# Altium PCB BLDC-Driver-v2.0.PcbDoc (part 6 of 6)
Units mil, origin at the board's own origin, x right, y up, seen from the top; angles counter-clockwise.
Board outline 5905.51 x 4330.71 mil, 4 copper layers (Top Layer, Layer 1, Layer 2, Bottom Layer), stack 62.047 mil thick; 284 components, 198 nets, 819 pads, 521 vias.
Unrouted connection lines stored in the file: 1.
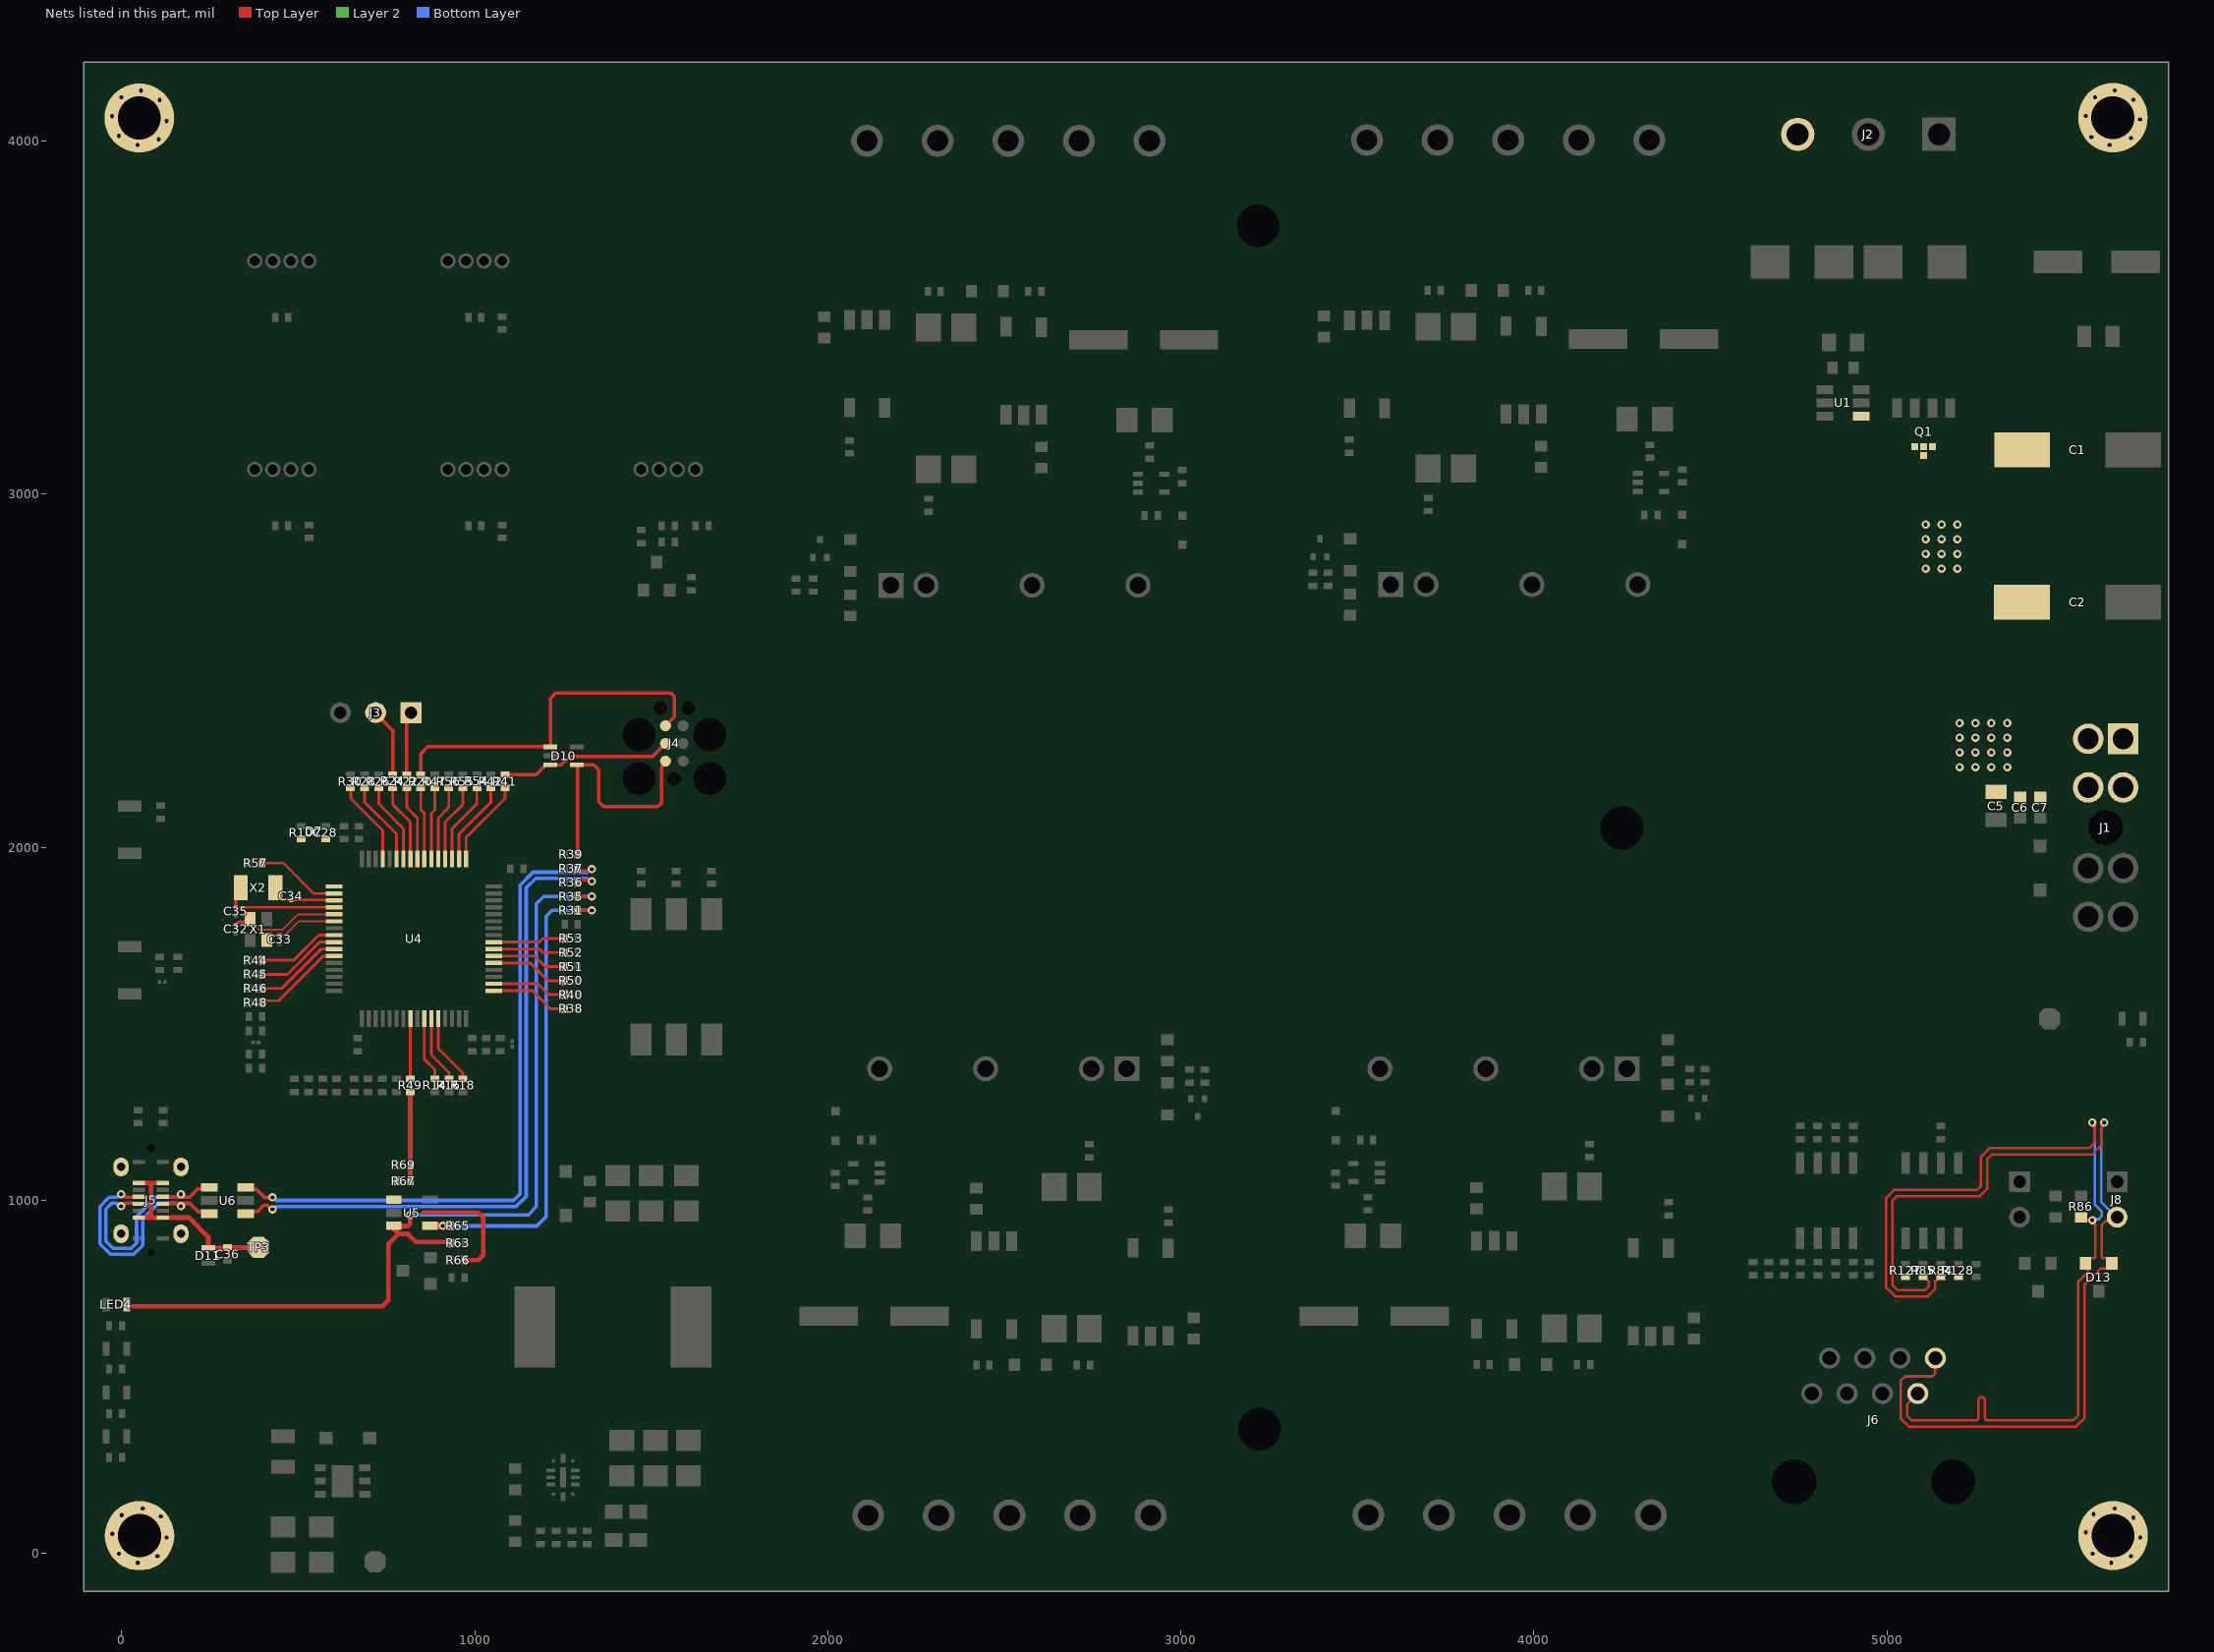
[diagram p5: the nets of this part, all layers, seen from the top]

## Via types
v1: diameter 23.62, hole 11.81, Top Layer to Bottom Layer, tented both sides, 497 vias
v2: diameter 15.75, hole 7.87, Top Layer to Bottom Layer, 24 vias

## Nets (pads, with @x,y where several pads share a name; then routed paths per layer and width w, separated by ;. In a path a pad name is that pad's centre, name@x,y a point inside that pad or via, vN(x,y) a via of type N, cw(c..) or ccw(c..) an arc to the next point about the centre after c; other vN are vias at no path point) (continued)
PA14: R41.1 U4.49 | length 246.4
  Top Layer w8: U4.49@975.51,1967.47 975.51,2027.66 1085.75,2137.89 R41.1@1085.75,2168.24
PA15: R42.1 U4.50 | length 238.1
  Top Layer w8: U4.50@955.83,1967.47 955.83,2037.4 1045.98,2127.55 R42.1@1045.98,2168.24
PB0: R14.2 U4.26 | length 183.2
  Top Layer w8: U4.26@857.4,1514.71 857.4,1399.51 887.32,1369.59 R14.2@887.32,1343.94
PB1: R16.2 U4.27 | length 191.5
  Top Layer w8: U4.27@877.09,1514.71 877.09,1411.32 927.09,1361.32 R16.2@927.08,1343.94
PB2: R18.2 U4.28 | length 199.8
  Top Layer w8: U4.28@896.77,1514.71 896.77,1429.82 966.85,1359.75 R18.2@966.85,1343.94
PB3: R20.2 U4.55 | length 204.8
  Top Layer w8: R20.2@847.56,2168.24 847.56,2106.3 857.4,2096.46 U4.55@857.4,1967.47
PB4: R22.2 U4.56 | length 213.2
  Top Layer w8: R22.2@807.8,2168.24 807.8,2112.59 837.72,2082.68 U4.56@837.72,1967.47
PB5: R24.2 U4.57 | length 221.5
  Top Layer w8: R24.2@768.04,2168.24 768.04,2120.86 818.03,2070.87 U4.57@818.03,1967.47
PB6: R26.2 U4.58 | length 229.8
  Top Layer w8: R26.2@728.27,2168.24 728.27,2122.44 798.35,2052.36 U4.58@798.35,1967.47
PB7: R28.2 U4.59 | length 238.1
  Top Layer w8: R28.2@688.51,2168.24 688.51,2127.55 778.66,2037.4 U4.59@778.66,1967.47
PB8: R30.2 U4.61 | length 238.3
  Top Layer w8: R30.2@648.75,2168.24 648.75,2137.89 739.29,2047.34 U4.61@739.29,1967.47
PB12: R38.2 U4.33 | length 221.8
  Top Layer w8: U4.33@1054.25,1593.45 1163.55,1593.45 1183.24,1573.77 1214.33,1542.67 R38.2@1255.03,1542.67
PB13: R40.2 U4.34 | length 213.5
  Top Layer w8: U4.34@1054.25,1613.14 1178.52,1613.14 1209.22,1582.43 R40.2@1255.03,1582.44
PC0: R44.1 U4.8 | length 233
  Top Layer w8: R44.1@398.01,1679.62 487.04,1679.62 558.35,1750.94 U4.8@601.5,1750.94
PC1: R45.1 U4.9 | length 241.3
  Top Layer w8: R45.1@398.01,1639.86 469.61,1639.86 561.01,1731.25 U4.9@601.5,1731.25
PC2: R46.1 U4.10 | length 249.7
  Top Layer w8: R46.1@398.01,1600.09 453.51,1600.09 564.98,1711.57 U4.10@601.5,1711.57
PC3: R48.1 U4.11 | length 258
  Top Layer w8: R48.1@398.01,1560.33 402.86,1565.18 444.31,1565.18 571.01,1691.87 U4.11@601.5,1691.88
PC4: R49.1 U4.24 | length 170.8
  Top Layer w8: R49.1@818.03,1343.95 U4.24@818.03,1514.71
PC6: R50.1 U4.37 | length 221.5
  Top Layer w8: U4.37@1054.25,1672.2 1157.65,1672.2 1207.65,1622.2 R50.1@1255.03,1622.2
PC7: R51.1 U4.38 | length 213.2
  Top Layer w8: U4.38@1054.25,1691.88 1169.46,1691.88 1199.38,1661.96 R51.1@1255.03,1661.96
PC8: R52.1 U4.39 | length 204.8
  Top Layer w8: U4.39@1054.25,1711.57 1183.24,1711.57 1193.08,1701.73 R52.1@1255.03,1701.73
PC9: R53.1 U4.40 | length 204.8
  Top Layer w8: U4.40@1054.25,1731.25 1183.24,1731.25 1193.08,1741.09 R53.1@1255.03,1741.09
PC10: R54.1 U4.51 | length 229.8
  Top Layer w8: U4.51@936.14,1967.47 936.14,2052.36 1006.22,2122.44 R54.1@1006.22,2168.25
PC11: R55.1 U4.52 | length 221.5
  Top Layer w8: U4.52@916.46,1967.47 916.46,2070.87 966.46,2120.86 R55.1@966.46,2168.24
PC12: R56.1 U4.53 | length 213.2
  Top Layer w8: U4.53@896.77,1967.47 896.77,2082.68 926.69,2112.59 R56.1@926.69,2168.24
PC13: R57.1 U4.2 | length 239.2
  Top Layer w7: R57.1@398.01,1955.23 457.77,1955.23 543.95,1869.05 U4.2@601.5,1869.05
PC14-OSC32_IN: C34.2 U4.3 X2.2 | length 147.2
  Top Layer w7: X2.2@452.39,1850.3 C34.2@479.87,1850.3 ; C34.2@481.03,1850.14 U4.3@600.72,1850.14
PC15-OSC32_OUT: C35.2 U4.4 X2.1 | length 338.3
  Top Layer w7: C35.2@323.51,1829.8 323.51,1871.27 X2.1@337.28,1885.05 ; C35.2@324.12,1829.68 U4.4@601.5,1829.68
PD2: R47.2 U4.54 | length 204.8
  Top Layer w8: U4.54@877.09,1967.47 877.09,2096.46 886.93,2106.3 R47.2@886.93,2168.24
PH0-OSC_IN: C32.2 U4.5 X1.1 | length 313.4
  Top Layer w5.5: X1.1@363.76,1792.48 389.35,1766.9 456.86,1766.9 499.95,1809.99 U4.5@601.5,1809.99
  Top Layer w10: C32.2@323.51,1779.71 332.06,1788.26 355.6,1788.26 X1.1@363.76,1796.42
PH1-OSC_OUT: C33.2 U4.6 X1.3 | length 212.6
  Top Layer w5.5: X1.3@411.01,1737.37 411.01,1737.74 423.76,1750.49 C33.2@448.39,1750.49 449.06,1751.17 462.55,1751.17 467.78,1756.4 468.05,1756.4 501.96,1790.31 U4.6@601.5,1790.31
RS485_N: D13.2 J6.2 R84.2 R86.2 R128.1 | length 2843.6
  Top Layer w7: J6.2@5087.62,452.67 5057.29,422.34 5057.29,389.56 5069.85,377 5235.9,377 5251.6,377 ccw(c5251.6,385.5) 5260.1,385.5 5260.1,433.87 cw(c5268.6,433.87) 5277.1,433.87 5277.1,385.5 ccw(c5285.6,385.5) 5285.6,377 5306.1,377 5528.65,377 5542.21,390.56 5542.21,769.47 5569.26,796.52 5569.26,811.49 D13.2@5565.93,814.82 ; R84.2@5152.96,782.78 5149.46,782.78 5143.96,777.28 5143.96,777.1 5136.96,770.1 5136.96,748.92 5115.7,727.66 5023.45,727.66 4998.39,752.71 4998.39,1006.75 5021.17,1029.53 5256,1029.53 5266.5,1040.03 5266.5,1123.76 5290.39,1147.64 5573.41,1147.64 5589.76,1163.99 5589.76,1207.69 5581.95,1215.5 v1(5581.95,1220) ; R86.2@5547.62,952.18 5556.04,943.75 v1(5581.8,943.75) ; D13.2@5562.56,823 5575.2,835.64 5586.86,835.64 5590.96,839.74 5590.96,931.34 5582.21,940.09 v1@5582.21,944.16
  Layer 2 w7: J6.2@5087.62,452.67 J6.2@5099.14,452.67
  Bottom Layer w7: v1(5581.8,943.75) 5584.72,946.67 5600.56,946.67 5608.48,954.59 5608.48,968.58 5589.01,988.04 5589.01,1208.44 5581.95,1215.5 v1(5581.95,1220)
RS485_P: D13.1 J6.1 J8.2 R85.2 R127.1 | length 2905.7
  Top Layer w7: R85.2@5102.96,782.78 5106.46,782.78 5111.96,777.28 5111.96,777.18 5118.96,770.18 5118.96,756.37 5108.24,745.66 5030.9,745.66 5016.39,760.17 5016.39,999.3 5028.62,1011.53 5263.46,1011.53 5284.5,1032.58 5284.5,1116.3 5297.84,1129.64 5580.86,1129.64 5607.76,1156.53 5607.76,1207.69 5615.57,1215.5 v1(5615.57,1220) ; J6.1@5137.62,552.67 5137.62,510.07 5128.85,501.3 5052.1,501.3 5039.29,488.48 5039.29,382.1 5062.39,359 5536.1,359 5560.21,383.11 5560.21,762.01 5604.62,806.42 5624.72,806.42 D13.1@5637.36,819.06 ; D13.1@5637.36,823 5624.72,835.64 5613.06,835.64 5608.96,839.74 5608.96,930.74 5620.44,942.22 5642.33,942.22 J8.2@5652.3,952.18
  Bottom Layer w7: v1(5615.57,1220) 5615.57,1216.15 5607.01,1207.59 5607.01,995.5 5650.34,952.18 J8.2@5652.3,952.18
SHGND: J2.3 J5.S1 J5.S2 J5.S3 J5.S4 pad.MH1@49.93,4065.68 pad.MH1@50.67,49.93 pad.MH1@5640.49,4066.42 pad.MH1@5640.85,50.3
  other v1: 45.51,-27.07 5635.85,-26.86 101.42,-8.05 5691.77,-7.84 -7.48,-0.98 5582.87,-0.77 127.51,44.93 5717.85,45.14 -26.49,54.93 5563.88,59.54 5698.84,101.05 111.49,104.85 -0.4,107.92 5585.94,111.12 59.91,126.91 5645.85,127.14 44.93,3988.85 5631.25,3989.45 104.85,4004.86 5691.56,4008.44 5579.67,4011.51 -8.05,4014.93 126.91,4056.44 5717.65,4061.42 -27.07,4070.85 5563.65,4071.42 107.92,4116.76 5698.63,4117.33 -0.98,4123.83 5589.74,4124.4 54.93,4142.85 5645.65,4143.42
SWCLK: D10.3 J4.4 R41.2 | length 491.6
  Top Layer w10: R41.2@1085.75,2205.24 1085.83,2205.33 1173.72,2205.33 1201.8,2233.41 D10.3@1214.6,2233.41 1245.86,2233.41 1269.74,2257.29 1503.81,2257.29 J4.4@1540.56,2294.05
SWDIO: D10.4 J4.2 R39.2 | length 724.4
  Top Layer w10: R39.2@1292.03,1980.07 1292.03,2231.52 1290.14,2233.41 D10.4@1289.4,2233.41 1337.82,2233.41 1351.55,2219.69 1351.55,2128.58 1365.13,2115 1518.29,2115 1529.99,2126.69 1529.99,2227.79 1540.56,2238.37 J4.2@1540.56,2244.05
SWO: D10.1 J4.6 R20.1 | length 1026.2
  Top Layer w10: R20.1@847.16,2205.24 847.16,2264.76 866.99,2284.59 1145.98,2284.59 D10.1@1214.6,2284.59 1214.6,2421.26 1230.44,2437.1 1554.42,2437.1 1565.56,2425.95 1565.56,2369.05 J4.6@1540.56,2344.05
USART2_RX: J3.2 R24.1 | length 197.3
  Top Layer w10: J3.2@719.43,2381.09 718.53,2380.2 768.53,2330.2 768.53,2206.14 R24.1@767.63,2205.25
USART2_TX: J3.1 R22.1 | length 175.8
  Top Layer w10: R22.1@807.4,2205.24 J3.1@807.4,2381.09
USB_FS_N: R36.2 U6.1 | length 1946.1
  Top Layer w10: U6.1@351.57,961.85 357.9,968.17 385.12,968.17 403,986.05 412.24,986.05 423.95,974.34 v1(427,974.34) ; R36.2@1292.03,1900.54 1292.03,1903.61 1296.03,1907.61 1324.32,1907.61 1328.31,1903.61 v1(1332,1903.61)
  Bottom Layer w10: v1(427,974.34) 430.69,974.34 439,982.65 1117.88,982.65 1146,1010.78 1146,1885.47 1172.74,1912.21 1319.72,1912.21 1328.31,1903.61 v1(1332,1903.61)
USB_FS_OVCR: LED4.2 R35.2 R63.1 U5.3 | length 2668.5
  Top Layer w10: R35.2@1292.03,1860.78 v1(1332,1860.78)
  Top Layer w13.21: LED4.2@14.81,704.56 14.81,702.91 18.04,699.68 738.42,699.68 755.91,717.16 755.91,877.08 783.58,904.75 786.25,904.75 ; U5.3@770.82,927.22 U5.3@772.09,927.22 ; 794.56,904.75 786.25,904.75 ; 796.39,904.75 811.97,904.75 811.97,903.17 833.34,881.79 932.11,881.79 934.5,879.4 R63.1@934.5,878.62 ; v1(816.82,958.84) 816.82,932.43 811.61,927.22 U5.3@772.09,927.22 ; U5.3@772.09,927.22 771.61,927.7 759.69,927.7 766.3,921.99 786.25,904.75
  Bottom Layer w10: v1(816.82,958.84) 1152.1,958.84 1175,981.74 1175,1840.02 1195.76,1860.78 v1(1332,1860.78) v1@1335,1860.78
USB_FS_P: R37.2 U6.3 | length 1943.3
  Top Layer w10: U6.3@351.57,1036.65 357.79,1030.43 382.79,1030.43 405.26,1007.96 v1(427,1007.96) ; R37.2@1292.03,1940.31 1292.03,1937.28 1296.03,1933.28 1323.78,1933.28 1328.31,1937.81 v1(1332,1937.81)
  Bottom Layer w10: v1(427,1007.96) 430.69,1007.96 439,999.65 1110.84,999.65 1129,1017.82 1129,1892.51 1165.7,1929.21 1319.72,1929.21 1328.31,1937.81 v1(1332,1937.81)
USB_FS_PWR_EN: R31.2 R65.1 U5.4 | length 1393
  Top Layer w10: R31.2@1292.03,1821.02 v1(1332,1821.02)
  Top Layer w20: U5.4@873.18,927.22 v1(909.46,927.22) R65.1@932.08,927.22
  Bottom Layer w10: v1(909.46,927.22) 1175.72,927.22 1202.84,954.34 1202.84,1805.12 1218.73,1821.02 v1(1332,1821.02) v1@1335,1821.02
USB_N: J5.A7 J5.B7 U6.6 | length 749
  Top Layer w10: v1(-1.57,1016.65) 2.11,1016.65 10.42,1008.34 34.64,1008.34 35.08,1008.78 47.89,1008.78 J5.A7@48.9,1009.8 ; J5.B7@117.13,990 118.03,990.91 131.06,990.91 131.27,991.11 179.48,991.11 ; 155.95,991.11 v1@164.03,983.03 ; v1(167.72,983.03) 171.4,983.03 179.48,991.11 ; U6.6@244.28,962.44 239.23,967.49 216.63,967.49 193.01,991.11 179.48,991.11
  Bottom Layer w10: v1(-1.57,1016.65) -5.26,1016.65 -13.57,1008.34 -35.43,1008.34 -61.31,982.46 -61.31,876.76 -31.33,846.78 34.12,846.78 59.41,872.08 59.41,947.27 103.49,991.34 155.72,991.34 164.03,983.03 v1(167.72,983.03)
USB_P: J5.A6 J5.B6 U6.4 | length 688.9
  Top Layer w10: v1(-1.57,983.03) 2.11,983.03 10.42,991.34 34.64,991.34 35.08,990.91 48.11,990.91 J5.A6@49.02,990 ; J5.B6@117.46,1009.35 118.03,1008.78 131.06,1008.78 131.73,1008.11 191.89,1008.11 215.71,1031.93 238.96,1031.93 U6.4@244.28,1037.24 ; 155.95,1008.57 v1@164.03,1016.65 ; v1@171.4,1016.65 179.48,1008.57
  Bottom Layer w10: v1(-1.57,983.03) -5.26,983.03 -13.57,991.34 -28.39,991.34 -44.31,975.42 -44.31,883.8 -24.29,863.78 27.07,863.78 42.41,879.12 42.41,954.31 96.45,1008.34 155.72,1008.34 164.03,1016.65 v1(167.72,1016.65)
VBAT: C28.2 D7.2 R10.2 U4.1
VBUS_DET: R49.2 R67.1 R69.2 | length 252.1
  Top Layer w13.21: R67.1@817.75,1054.81 R49.2@817.79,1306.95
VBUSc: C36.1 D11.1 J5.A4 J5.A9 J5.B4 J5.B9 R66.1 R67.2 TP3.1 U5.1 | length 899.5
  Top Layer w13.21: J5.A4@49.02,950.63 83.07,950.63 ; J5.A9@49.02,1049.06 83.07,1049.06 ; J5.B4@117.13,1049.06 83.07,1049.06 ; C36.1@299.66,865.16 D11.1@245.5,865.16 245.5,896.43 191.3,950.63 J5.B9@117.13,950.63 83.07,950.63 ; C36.1@300.5,866 387.23,866 TP3.1@388.07,866.84 ; 854.71,965.8 1009.41,965.8 1024,951.21 1024,843.86 1010.73,830.59 R66.1@971.51,830.59 ; 83.07,950.63 83.07,1049.06
VIN: C1.1 C2.1 C5.2 C6.2 C7.2 J1.1 J1.2 J1.7 J1.8 Q1.5 Q1.6 Q1.7 Q1.8 U1.4
  other v1: 5206,2227 5251,2227 5296,2227 5341,2227 5206,2268.64 5251,2268.64 5296,2268.64 5341,2268.64 5206,2310.28 5251,2310.28 5296,2310.28 5341,2310.28 5206,2351.92 5251,2351.92 5296,2351.92 5341,2351.92 5110,2789.33 5155,2789.33 5200,2789.33 5110,2830.98 5155,2830.98 5200,2830.98 5110,2872.62 5155,2872.62 5200,2872.62 5110,2914.26 5155,2914.26 5200,2914.26
pads on no net: D10.5 J1. J4.MP1 J4.MP2 J4.MP3 J4.MP4 J4.MP5 J4.MP6 J4.MP7 J5.A8 J5.B8 J5.MH J6. J6.3 J6.6 LED10.1 U3.1 U3.4 U3.5 U4.25 U4.29 U4.35 U4.36 U6.5

## Polygon pours and split planes (outlines as drawn)
GND on Layer 1 "GND_L02_P175" (solid, pour order 175): -107.18,-107.18 -107.18,4223.53 5798.33,4223.53 5798.33,-107.18
SHGND on Layer 1 "SHGND_L02_P111" (solid, pour order 111): 110.19,925.59 165.78,870 200.19,870 209,878.81 209,1120.63 201.46,1128.17 162.57,1128.17 108.5,1074.11 55.89,1074.11 0,1130 0,3869.25 256.35,3869.25 256.35,4125.95 2844.77,4125.95 4663.01,4125.95 4680,4108.96 4680,3960 4690,3950 4800,3950 4810,3960 4810,4110 4835,4135 5444.05,4135 5444.05,3860 5715,3860 5715,-96.98 5798.33,-96.98 5798.33,3920 5798.33,4223.53 -107.18,4223.53 -107.18,-107.18 0,-107.18 0,870 55.59,925.59
AGND on Layer 1 "AGND_L02_P130" (solid, pour order 130): 253,1521.97 263.68,1532.65 562.65,1532.65 578.02,1548.02 578.02,1772.78 595.55,1791.33 662.27,1791.33 677.24,1776.36 677.24,1461.88 661.99,1446.63 265.15,1446.63 253,1458.78
SHGND on Layer 1 "SHGND_L02_P110" (solid, pour order 110): 247.47,-35 247.47,256.72 -16.81,256.72 -106.81,346.72 -106.81,-106.81 5798.7,-106.81 5798.7,310 5735.8,247.1 5434.8,247.1 5434.8,-35
3V3 on Layer 2 "3V3_L03_P124" (solid, remove dead copper, pour order 124): 1003.56,2807 1911.15,2807 1964.46,2860.3 4449.93,2860.3 4449.93,3072.44 2577.45,3072.44 2577.45,3381.03 4655.28,3381.03 4655.28,1314.97 5225.44,1314.97 5225.44,699.5 2640.98,699.5 2640.98,1119.52 2481.29,1119.52 2481.29,699.5 1920.5,699.5 1897,723 1897,910 1853,954 1246.43,954 1142.43,850 909.13,850 870.06,810.92 870.06,239.06 823,192 351,192 292,251 292,1059.25 2348.94,1059.25 2348.94,1254.56 2561.13,1254.56 2609.69,1206 2679.23,1206 2553.73,1331.5 482.91,1331.5 450.69,1363.73 450.69,2125.16 484.78,2159.25 1003.56,2159.25 1141.65,2021.16 3997.75,2021.16 4328.26,1690.65 4328.26,1193.7 4408.44,1193.7 4408.44,1740.18 4026.41,2122.21 1271,2122.21 1189.79,2122.21 1037,2275 1037,2585.09 3508,2585.09 3508,2644 1003.56,2644
24V on Layer 2 "24V_L03_P171" (solid, pour order 171): 5772.71,1350 5772.71,2022 4694.33,2022 4694.33,1350
5V on Layer 2 "5V_L03_P125" (solid, remove dead copper, pour order 125): 835.2,158 903.68,226.48 903.68,803.68 922.95,822.95 1162.51,822.95 1261.56,922 1840.16,922 1865.67,896.49 1865.67,701.61 1900.28,667 2499.12,667 2609.47,556.65 5218.96,556.65 5218.96,-79.35 -84.95,-79.35 -84.95,4195.42 4655.28,4195.42 4655.28,3425.29 2521,3425.29 2521,3041 294,3041 255.49,3002.49 255.49,1978.99 255.49,1144.1 255.49,239.51 337,158
VIN on Layer 2 "VIN_L03_P178" (solid, pour order 178): 4694.33,3174.78 4694.33,2067 5772.71,2067 5772.71,3174.78
NetC3_1 on Layer 2 "NETC3_1_L03_P177" (solid, pour order 177): 4694.33,3217.94 4694.33,4195.42 5772.71,4195.42 5772.71,3217.94
24V on Layer 2 "24V_L03_P123" (solid, pour order 123): 1095.48,213.91 1080.9,228.49 1080.9,390.15 1094.9,404.15 1576.59,404.15 1591.99,388.76 1591.99,224.34 1581.56,213.91
GND on Top Layer "GND_L01_P179" (solid, remove dead copper, pour order 179): 4544,335.66 5798.7,335.66 5798.7,-83.86 -77,-83.86 -77,4194.56 5779.62,4194.56 5779.62,1284.41 4544,1284.41
24V on Top Layer "24V_L01_P169" (solid, remove dead copper, pour order 169): 4692.8,2608 4731.41,2646.61 4731.41,3165 4870,3165 4870,2099 5779.62,2099 5779.62,1284.41 4507.32,1284.41 4507.32,1331.88 4184.62,1331.88 4184.62,1284.41 3127.16,1284.41 3127.16,1331.88 2767.62,1331.88 2767.62,1284.41 2253,1284.41 2253,2576.71 2046.29,2576.71 2046.29,2780.9 2044.24,2796.65 2258.46,2796.65 2258.46,2826.61 3315.47,2826.61 3315.47,2783.05 3674.44,2783.05 3674.44,2826.61 4188.67,2826.61 4188.67,2608
GND on Top Layer "GND_L01_P168" (solid, pour order 168): 3715.23,2846.89 3715.23,2900.7 3315.06,2900.7 3315.06,3644.56 4036.2,3644.56 4036.2,3150.1 4324.82,3150.1 4324.82,3315.56 4456.46,3315.56 4471.33,3300.69 4471.33,2846.89
MOT3_PWR_POS on Top Layer "MOT3_PWR_POS_L01_P167" (solid, pour order 167): 4492.21,3226.42 4492.21,3310.9 4466.55,3336.56 4324.82,3336.56 4324.82,3603.02 4262.06,3665.78 4262.06,4194.56 4711.06,4194.56 4711.06,2665.56 4674.55,2629.05 4209.06,2629.05 4209.06,2826.5 4463.67,2826.5 4492.21,2855.04
MOT3_PWR_NEG on Top Layer "MOT3_PWR_NEG_L01_P166" (solid, pour order 166): 4303.46,3592.15 4241.45,3654.16 4241.45,4194.56 4056.21,4194.56 4056.21,3801.31 4056.21,3170.31 4303.46,3170.31
GND on Top Layer "GND_L01_P165" (solid, pour order 165): 2299.24,2844.75 2299.24,2898.56 1909,2898.56 1909,3642.41 2620.22,3642.41 2620.22,3147.95 2908.84,3147.95 2908.84,3313.41 3040.48,3313.41 3055.35,3298.55 3055.35,2844.75
MOT4_PWR_POS on Top Layer "MOT4_PWR_POS_L01_P164" (solid, pour order 164): 3076.23,3224.28 3076.23,3308.75 3050.57,3334.41 2908.84,3334.41 2908.84,3600.88 2846.08,3663.63 2846.08,4192.41 3295.08,4192.41 3295.08,2663.41 3258.57,2626.9 2793.08,2626.9 2793.08,2824.36 3047.69,2824.36 3076.23,2852.9
MOT4_PWR_NEG on Top Layer "MOT4_PWR_NEG_L01_P163" (solid, pour order 163): 2887.48,3590.01 2825.47,3652.02 2825.47,4192.41 2640.23,4192.41 2640.23,3799.17 2640.23,3168.17 2887.48,3168.17
5V on Top Layer "5V_L01_P126" (solid, remove dead copper, pour order 126): 1230.78,850 1330,850 1340,840 1339.67,839.67 1339.67,526.33 1670.62,526.33 1670.62,995.38 1656.19,1009.81 1247.2,1009.81 1230.78,993.38
GND on Top Layer "GND_L01_P156" (solid, pour order 156): 4143.83,1264.67 4143.83,1210.86 4544,1210.86 4544,467 3822.86,467 3822.86,961.46 3534.24,961.46 3534.24,796 3402.6,796 3387.73,810.86 3387.73,1264.67
GND on Top Layer "GND_L01_P155" (solid, pour order 155): 2726.99,1263.81 2726.99,1210 3127.16,1210 3127.16,466.14 2406.01,466.14 2406.02,960.6 2117.4,960.6 2117.4,795.14 1985.75,795.14 1970.89,810.01 1970.89,1263.81
MOT1_PWR_POS on Top Layer "MOT1_PWR_POS_L01_P154" (solid, pour order 154): 1950.01,884.28 1950.01,799.8 1975.67,774.14 2117.4,774.14 2117.4,507.68 2180.16,444.92 2180.16,-83.86 1731.16,-83.86 1731.16,1445.14 1767.67,1481.65 2233.16,1481.65 2233.16,1284.2 1978.54,1284.2 1950.01,1255.66
MOT1_PWR_NEG on Top Layer "MOT1_PWR_NEG_L01_P151" (solid, pour order 151): 2138.75,518.55 2200.76,456.54 2200.76,-83.86 2386.01,-83.86 2386.01,309.39 2386.01,940.39 2138.75,940.39
MOT2_PWR_POS on Top Layer "MOT2_PWR_POS_L01_P150" (solid, pour order 150): 3366.85,885.14 3366.85,800.66 3392.51,775 3534.24,775 3534.24,508.54 3597,445.78 3597,-83 3148,-83 3148,1446 3184.51,1482.51 3650,1482.51 3650,1285.05 3395.39,1285.05 3366.85,1256.51
MOT2_PWR_NEG on Top Layer "MOT2_PWR_NEG_L01_P142" (solid, pour order 142): 3555.59,519.41 3617.61,457.39 3617.61,-83 3802.85,-83 3802.85,310.25 3802.85,941.25 3555.59,941.25
24V on Top Layer "24V_L01_P141" (solid, pour order 141): 5779.62,1986.79 5779.62,1329.62 5750,1300 5411.06,1300 5378.26,1332.8 5378.26,1986.79
NetC3_1 on Top Layer "NETC3_1_L01_P140" (solid, pour order 140): 5064.19,3292 4970,3292 4970,3574 5084.13,3574 5084.13,4195.42 5779.62,4195.42 5779.62,3194.77 5064.19,3194.77
VIN on Top Layer "VIN_L01_P139" (solid, pour order 139): 4995.45,3174.78 4995.45,3233.26 4890.88,3233.26 4890.88,2119.54 5779.62,2119.54 5779.62,3174.78
VBUSc on Top Layer "VBUSC_L01_P138" (solid, pour order 138): 715,720 728.69,733.69 728.69,938.87 739.96,950.14 988.36,950.14 995.68,942.82 995.68,878.49 969.87,878.49 953,861.62 953,812.93 1056.93,812.93 1056.93,970 1044.82,984.18 881.18,984.18 833.09,1032.28 788.71,1032.28 788.71,1067.28 659.46,1067.28 647,1054.81 647.29,991.19 612.63,956.54 -54.09,956.54 -54.09,720
3V3 on Top Layer "3V3_L01_P137" (solid, pour order 137): 883,288.1 900,305.1 900,656.81 883.81,673 3,673 -7.54,662.46 -7.54,611.58 53.42,611.58 60.82,604.18 60.82,552.82 53.71,545.71 -7.54,545.71 -7.54,487.76 53.24,487.76 60.82,480.18 60.82,429.82 52.89,421.89 -7.54,421.89 -7.54,363.65 53.76,363.65 61.87,355.54 61.87,288.1 656.23,288.1 656.23,364.65 750,364.65 750,288.1
24V on Top Layer "24V_L01_P136" (solid, pour order 136): 1324.43,384.1 1340.33,400 1628,400 1670.57,400 1670.57,289.14 1365,289.14 1365,229.24 1272.07,229.24 1272.07,241.86 1324.43,241.86
GND on Top Layer "GND_L01_P135" (solid, pour order 135): 1189.6,127.24 1189.6,151.57 1163.61,151.57 1163.61,86.06 1260.86,86.06 1260.86,243.34 1239.9,243.34 1239.9,127.24
24V on Top Layer "24V_L01_P133" (solid, pour order 133): 1228.76,241.86 1176.4,241.86 1176.4,296.83 1149.72,296.83 1149.72,228.24 1228.76,228.24
NetC9_1 on Top Layer "NETC9_1_L01_P132" (solid, pour order 132): 1080,755.46 1260.87,755.46 1260.87,256.13 1240.01,256.13 1240.01,319.99 1239.61,320.39 1132.36,320.39 1132.36,220.87 1132.36,208.62 1080,208.62
AGND on Top Layer "AGND_L01_P131" (solid, remove dead copper, pour order 131): 638.83,1680.91 635.16,1677.23 601.5,1677.23 601.5,1667.26 669.97,1667.26 677.24,1674.53 677.24,1767.71 674.33,1770.62 641.65,1770.62 638.83,1767.81
AVDD on Top Layer "AVDD_L01_P129" (solid, pour order 129): 385.06,1532.65 432.34,1532.65 565.98,1666.29 625.12,1666.29 625.12,1600.06 426.83,1401.77 385.06,1401.77
AGND on Top Layer "AGND_L01_P128" (solid, pour order 128): 369.92,1386.59 322.93,1386.59 322.93,1441.97 373.78,1441.97 373.78,1532.65 263.68,1532.65 253,1521.97 253,1376.38 267.79,1361.59 369.92,1361.59
VBAT on Top Layer "VBAT_L01_P127" (solid, pour order 127): 625.12,1923.46 606.27,1923.46 596.26,1933.47 596.26,2037.92 496.41,2037.92 496.41,1938.39 549.53,1885.27 625.12,1885.27
GND on Bottom Layer "GND_L04_P172" (solid, remove dead copper, pour order 172): 71.95,301.72 1880.39,301.72 1880.39,1160.03 2985,1160.03 2985,2876 2891,2970 -66,2970 -66,4175 5762.27,4175 5762.27,-69 71.95,-69
24V on Bottom Layer "24V_L04_P170" (solid, pour order 170): 1849.95,328.47 1849.95,1190.69 2949.71,1190.69 2949.71,1569.75 2915.64,1603.81 1341,1603.81 1341,328.47
3V3 on Bottom Layer "3V3_L04_P122" (solid, remove dead copper, pour order 122): 2869.21,2897.98 2936.77,2830.42 2936.78,1660 1308,1660 1308,328.47 80,328.47 80,2897.98
GND on Bottom Layer "GND_L04_P176" (solid, remove dead copper, pour order 176): 1894,3123 1894,4174 5750,4174 5750,-67 1894,-67 1894,1145.85 4520,1145.85 4520,3123

## Other copper
Top Layer:
  rectangle net GND: 5041.15,912.35 5064.77,933.01
  region net RS485_N: 5204.57,787.3 5154.93,787.3 5154.93,780.71 5204.57,780.71
  rectangle net RS485_P: 5051.35,780.72 5100.99,787.31
  rectangle net NRST_MCU: 94.7,1613.37 109.99,1661.31
  rectangle net GND: 5279.26,1984.24 5451.98,2099.14
  rectangle net GND: 31.89,885.67 134.25,897.48
  rectangle net GND: 5141.12,1209.74 5164.83,1230.4
  rectangle net 485_DIN_1: 5041.15,1124.94 5064.77,1145.61
  rectangle net 485_ROUT_1: 5191.15,1124.94 5214.77,1145.61
  region net GND: 5264.8,787.82 5241.09,787.82 5241.09,762.16 5264.8,762.16
  region net GND: 5611.8,733.33 5588.09,733.33 5588.09,712.67 5611.8,712.67
  region net CAN1_STB: 4961.5,787.74 4937.79,787.74 4937.79,767.08 4961.5,767.08
  rectangle net 3V3: 4792.85,1104.99 4816.47,1145.61
  region net 3V3: 4433.13,3121.31 4355.2,3121.31 4355.2,3051.35 4433.13,3051.35
  region net GND: 4460.23,3148.81 4316.26,3148.81 4316.26,3130.81 4460.23,3130.81
  rectangle net GND: 4345.08,3024.24 4460.23,3042.24
  region net GND: 4466.55,3148.81 4442.44,3148.81 4442.44,3024.24 4466.55,3024.24
  region net 3V3: 3017.15,3119.17 2939.21,3119.17 2939.21,3049.21 3017.15,3049.21
  region net GND: 3044.25,3146.67 2900.28,3146.67 2900.28,3128.67 3044.25,3128.67
  rectangle net GND: 2929.09,3022.1 3044.25,3040.1
  region net GND: 3050.57,3146.67 3026.46,3146.67 3026.46,3022.1 3050.57,3022.1
  rectangle net 3V3: 2009.09,989.39 2087.02,1059.35
  rectangle net GND: 1981.99,961.89 2125.95,979.89
  region net GND: 2097.14,1086.46 1981.99,1086.46 1981.99,1068.46 2097.14,1068.46
  rectangle net GND: 1975.67,961.89 1999.78,1086.46
  rectangle net GND: 3392.51,962.75 3416.62,1087.32
  region net GND: 3513.98,1087.32 3398.83,1087.32 3398.83,1069.32 3513.98,1069.32
  rectangle net GND: 3398.83,962.75 3542.8,980.75
  rectangle net 3V3: 3425.93,990.25 3503.86,1060.21
  rectangle net 3V3: 1030.63,1882.82 1109.94,1951.56
  rectangle net GND: 1415.41,1410.77 1701.15,1500.77
  rectangle net NetC3_1: 4890.88,3283.66 5260,3574
  region net NetC8_1: 4860.89,3375.96 4800.29,3375.96 4800.29,3283.66 4860.89,3283.66
  rectangle net NetD1_1: 4850.59,3621.76 4989.36,3691.93
  rectangle net NetQ1_4: 4890.88,3243.72 5043.61,3270.66
  rectangle net VIN: 4903.44,3173.4 4995.84,3233.26
  rectangle net GND: 4792.32,1209.73 4816.03,1230.4
  rectangle net GND: 4842.82,1209.74 4866.53,1230.4
  region net GND: 4866.47,1141.97 4842.85,1141.97 4842.85,1085.03 4866.47,1085.03
  rectangle net CAN1_RXD: 4742.87,1209.78 4766.57,1230.45
  rectangle net CAN1_TXD: 4893.87,1209.78 4917.57,1230.45
  region net GND: 4766.5,787.82 4742.8,787.82 4742.8,767.16 4766.5,767.16
  region net GND: 5440.29,733.18 5416.59,733.18 5416.59,712.52 5440.29,712.52
  rectangle net GND: 4654.16,824.74 4677.87,845.4
  rectangle net GND: 4609.16,824.74 4632.87,845.4
  region net 3V3: 4916.5,787.82 4892.8,787.82 4892.8,767.16 4916.5,767.16
  rectangle net GND: 5618.8,2644.56 5779.62,3692.06
  rectangle net GND: 4772.68,3246.26 4860.89,3270.66
  rectangle net GND: 4525,3610.61 4724.61,3705.1
  rectangle net GND: 5616.83,1494.55 5676.37,1533.92
  rectangle net VIN: 4890.88,3198.46 4995.84,3233.26
  rectangle net NetR1_1: 4800.29,3208.85 4860.89,3233.26
  rectangle net NetQ2_3: 1459.18,2788.71 1538.58,2877.22
  rectangle net 5V: 1557.58,2852.22 1575.58,2922.51
  region net GND: 886.82,763 863.11,763 863.11,738.82 886.82,738.82
  region net GND: 971.5,792.72 971.5,769.02 995.68,769.02 995.68,792.72
  region net 3V3: 971.5,890.33 971.5,866.62 995.68,866.62 995.68,890.33
  rectangle net USB_FS_OVCR: 749.17,870.47 839.95,939.03
  region net GND: 257.21,821.85 233.5,821.85 233.5,805.54 257.21,805.54
  region net GND: 312.21,829 288.5,829 288.5,804.82 312.21,804.82
  rectangle net GND: 105.42,1251.02 129.12,1271.68
  rectangle net GND: 35.29,1251.02 59,1271.68
  region net GND: 351.57,987.54 351.57,1011.25 319.82,1011.25 319.82,987.54
  rectangle net GND: 31.89,1102.2 134.25,1114.02
  rectangle net NetLED5_1: -56.41,506.61 -26.54,598.8
  rectangle net 3V3: 423.34,288.1 656.23,500
  rectangle net NetLED2_1: -56.41,258.5 -26.54,350.69
  rectangle net NetLED3_1: -56.41,382.7 -26.54,474.89
  rectangle net GND: 680.14,299.61 725.14,344.26
  region net GND: 14.81,466.83 14.81,443.12 38.99,443.12 38.99,466.83
  region net GND: 14.81,342.71 14.81,319 38.99,319 38.99,342.71
  rectangle net NetLED4_1: -56.41,632.23 -26.54,724.42
  region net NetLED5_2: 14.81,590.64 14.81,566.94 38.99,566.94 38.99,590.64
  rectangle net 3V3: -7.96,363.65 38.99,421.89
  rectangle net 3V3: -7.96,487.55 38.99,545.8
  rectangle net 3V3: -8.66,611.58 60.82,673
  rectangle net GND: 676.16,288.1 729.49,344.26
  rectangle net 5V: 527,44.81 578.47,177.24
  rectangle net 5V: 527,44.81 704.46,135
  rectangle net GND: 595.2,232.35 704.46,252.04
  rectangle net GND: 307.14,-55 405,55.53
  rectangle net GND: 307.14,-55 491.84,4.81
  rectangle net NetC20_2: 421.84,44.81 491.84,264.48
  rectangle net NetC9_1: 1240,256.13 1260.87,320
  rectangle net GND: 1239.9,118.22 1260.86,243.34
  rectangle net NetC9_1: 1084,208.62 1228.76,220.87
  rectangle net NetC9_2: 1097.36,184.9 1228.76,197.43
  rectangle net 24V: 1148.64,228.24 1228.76,244.84
  region net GND: 1314.27,299.72 1271.08,299.72 1271.08,255.15 1314.27,255.15
  rectangle net GND: 1186.4,255.15 1229.74,299.72
  region net 24V: 1352.18,244.84 1272.07,244.84 1272.07,228.24 1352.18,228.24
  rectangle net GND: 1000,9.54 1082.51,86.06
  rectangle net GND: 1000,9.54 1132.36,47.78
  rectangle net GND: 1522.94,77.78 1670.57,250.03
  rectangle net 24V: 1148.64,228.24 1176.4,299.72
  rectangle net NetC9_1: 1080,208.62 1132.36,326.48
  rectangle net 24V: 1324.43,228.24 1365,384.1
  rectangle net GND: 1381.62,186.03 1610.15,250.03
  rectangle net 3V3: 656.5,1448.99 724.01,1480.17
  region net GND: 680.71,1427.07 657.01,1427.07 657.01,1406.41 680.71,1406.41
  rectangle net GND: 95.36,1689.26 119.07,1709.93
  rectangle net PC14-OSC32_IN: 416.02,1844.48 455.39,1920.48
  rectangle net GND: 473.97,1869.02 485.78,1894.64
  region net GND: 367.76,1749.02 337.66,1749.02 337.66,1725.75 367.76,1725.75
  rectangle net GND: 302,1800.28 329.41,1812.09
  rectangle net PC15-OSC32_OUT: 317.6,1844.48 356.97,1920.48
  rectangle net GND: 317.6,1717.68 379.52,1761.99
  rectangle net AVDD: 385.06,1401.77 406.92,1532.65
  rectangle net AGND: 351.79,1441.97 373.78,1532.65
  rectangle net AVDD: 385.06,1401.77 426.83,1416.87
  rectangle net AGND: 322.93,1512.41 373.78,1532.65
  rectangle net AGND: 319.18,1441.93 366.52,1454.14
  rectangle net AGND: 307,1374.09 369.92,1387.02
  rectangle net 3V3: 1020.1,1450.59 1111.13,1538.34
  rectangle net 3V3: 975.51,1491.09 1064.97,1538.34
  region net GND: 1084.15,1422.59 1060.79,1422.59 1060.79,1375.09 1084.15,1375.09
  region net GND: 1044.29,1422.59 1020.93,1422.59 1020.93,1375.09 1044.29,1375.09
  rectangle net NRST_MCU: 94.7,1643.31 165.5,1661.31
  rectangle net NetJ4_3: 147.29,1684.83 170.73,1705.49
  rectangle net 3V3: 635.25,1943.85 680.24,1991.09
  rectangle net 3V3: 616.65,1943.85 641.65,2031.59
  rectangle net VBAT: 496.41,2013.59 596.26,2040.26
  rectangle net GND: 617.46,2059.59 640.82,2077.09
  rectangle net GND: 660.46,2059.59 683.82,2077.09
  rectangle net GND: 566.19,2059.59 589.55,2077.09
  rectangle net 3V3: 497.22,2059.59 520.58,2077.09
  pour cut-out: 3088.27,351.51 cw(c3223.26,351.51) 3223.26,486.5 cw(c3223.26,351.51) 3358.25,351.51 cw(c3223.26,351.51) 3223.26,216.52 cw(c3223.26,351.51)
  pour cut-out: 3084.31,3760.04 ccw(c3219.3,3760.04) 3219.3,3625.06 ccw(c3219.3,3760.04) 3354.29,3760.04 ccw(c3219.3,3760.04) 3219.3,3895.03 ccw(c3219.3,3760.04)
  pour cut-out: 4131.89,2054.22 ccw(c4250,2054.22) 4250,1936.11 ccw(c4250,2054.22) 4368.11,2054.22 ccw(c4250,2054.22) 4250,2172.33 ccw(c4250,2054.22)
  region net SHGND: 5798.33,4001.04 5798.33,4223.53 5797.6,4224.27 5575.1,4224.27 ccw(c5640.49,4066.42) 5469.63,4066.42 ccw(c5640.49,4066.42) 5640.49,3895.56 ccw(c5640.49,4066.42)
  region net SHGND: 115.32,4223.53 -107.18,4223.53 -107.91,4222.8 -107.91,4000.3 ccw(c49.93,4065.68) 49.93,3894.83 ccw(c49.93,4065.68) 220.79,4065.68 ccw(c49.93,4065.68)
  region net SHGND: -107.18,115.32 -107.18,-107.18 -106.44,-107.91 116.05,-107.91 ccw(c50.67,49.93) 221.52,49.93 ccw(c50.67,49.93) 50.67,220.79 ccw(c50.67,49.93)
  region net SHGND: 5575.47,-107.55 5797.97,-107.55 5798.7,-106.81 5798.7,115.68 ccw(c5640.85,50.3) 5640.85,221.16 ccw(c5640.85,50.3) 5470,50.3 ccw(c5640.85,50.3)
  pour cut-out: 228.99,2650 229.01,3782 1724,3782 1724,2650
  pour cut-out: 1214.33,1983.01 1289.4,1983.01 1289.4,2250.3 1214.34,2250.3 1214.34,2478.79 1753.39,2478.79 1753.38,1625.62 1214.33,1625.62
  pour cut-out: -22.79,2096.95 97.5,2096.95 97.5,1954.5 -22.79,1954.5
  pour cut-out: -22.79,1684.79 130.88,1684.79 130.88,1556 -22.79,1556
  pour cut-out: 4712.47,1200.78 5240,1200.78 5240,1064.47 4712.47,1064.47
  pour cut-out: 4712.47,932.9 5240,932.9 5240,796.78 4712.47,796.78
  pour cut-out: 5599.26,2607 5599.26,3714.19 5798.33,3714.19 5798.33,2607
  pour cut-out: 4760.04,3574 4760.04,3735 5084.13,3735 5084.13,3574
  pour cut-out: 4729.06,3183.57 4729.06,3453.14 4889.19,3453.14 4889.19,3183.57
  region net VBAT: 549.53,1885.27 549.53,1891.59 625.12,1891.59 625.12,1882.82 551.97,1882.82
  text "1" at 382.2,4026.58 h50
Layer 1:
  pour cut-out: 5731.52,1740.98 5517.1,1740.98 5517.11,2365.81 5731.52,2365.81
  pour cut-out: 5423.66,3698.11 5423.66,3839.2 5695.91,3839.2 5695.91,3698.11
  pour cut-out: 5070,3698.11 5070,4114.61 5423.66,4114.61 5423.66,3698.11
  text "2" at 457.87,4026.58 h50
Layer 2:
  pour cut-out: 4843,3920.91 4843,4120.11 5046.61,4120.11 5046.61,3920.91
  text "3" at 575.2,4026.58 h50
Bottom Layer:
  region net SHGND: 115.32,4223.53 -107.18,4223.53 -107.91,4222.8 -107.91,4000.3 ccw(c49.93,4065.68) 49.93,3894.83 ccw(c49.93,4065.68) 220.79,4065.68 ccw(c49.93,4065.68)
  region net SHGND: -107.18,115.32 -107.18,-107.18 -106.44,-107.91 116.05,-107.91 ccw(c50.67,49.93) 221.52,49.93 ccw(c50.67,49.93) 50.67,220.79 ccw(c50.67,49.93)
  region net SHGND: 5798.33,4001.03 5798.33,4223.53 5797.6,4224.27 5575.1,4224.27 ccw(c5640.49,4066.42) 5469.63,4066.42 ccw(c5640.49,4066.42) 5640.49,3895.56 ccw(c5640.49,4066.42)
  region net SHGND: 5575.47,-107.55 5797.97,-107.55 5798.7,-106.81 5798.7,115.68 ccw(c5640.85,50.3) 5640.85,221.16 ccw(c5640.85,50.3) 5470,50.3 ccw(c5640.85,50.3)
  pour cut-out: 3140.66,351.51 ccw(c3223.26,351.51) 3223.26,268.92 ccw(c3223.26,351.51) 3305.85,351.51 ccw(c3223.26,351.51) 3223.26,434.11 ccw(c3223.26,351.51)
  pour cut-out: 3136.7,3760.04 ccw(c3219.3,3760.04) 3219.3,3677.45 ccw(c3219.3,3760.04) 3301.9,3760.04 ccw(c3219.3,3760.04) 3219.3,3842.64 ccw(c3219.3,3760.04)
  pour cut-out: 4131.89,2055 ccw(c4250,2055) 4250,1936.89 ccw(c4250,2055) 4368.11,2055 ccw(c4250,2055) 4250,2173.11 ccw(c4250,2055)
  pour cut-out: 5740.06,1737 5509,1737 5509,2375 5740.06,2375
  pour cut-out: 4704,1350 4704,1992.93 4915,1992.93 4915,1350
  pour cut-out: 5407.48,3706.1 5407.48,3847.19 5592.77,3847.19 5592.77,3706.1
  pour cut-out: 5053.81,3705.77 5053.81,4126.71 5407.48,4126.71 5407.48,3705.77
  text "4" at 658.2,4026.58 h50
Multi-Layer:
  pour cut-out: 353.39,4004.58 353.39,4098.56 678.14,4098.56 678.14,4004.58

## Silkscreen, mask and mechanical layers (free items; w line width, h text height)
Top Overlay:
  lines w5: 2240,3624.99 2352.95,3624.99 2377.12,3600.82 ; 2645.71,509.41 2676.41,484.14 2768.16,484.14 ; 3655.99,3627.13 3768.94,3627.13 3793.12,3602.96 ; 4062.56,510.27 4093.25,485 4185,485
  lines w7.5: 336.3,788.41 336.57,788.14 364.97,788.14 ; 1034.11,110.28 1080,110.28 ; 1594.96,2854.27 1723.16,2854.27 ; 1665,240.02 1700,240.02 ; 5285.82,799.79 5330.02,799.79 5330.02,631.91 ; 205,780 335,780 335,906.61 205,906.61 205,780 ; 364.97,648.99 496.71,648.99 496.71,788.13 364.97,788.13 364.97,648.99 ; 735,95.28 1034.11,95.28 1034.11,234.42 735,234.42 735,95.28 ; 1080,-16.42 1349.02,-16.42 1349.02,125 1080,125 1080,-16.42 ; 1355,169 1665,169 1665,369.14 1355,369.14 1355,169 ; 1499.48,2838.38 1594.48,2838.38 1594.48,2940 1499.48,2940 1499.48,2838.38 ; 1700,169 1900,169 1900,308.13 1700,308.13 1700,169 ; 1725.6,2723.63 1865.6,2723.63 1865.6,2859.46 1725.6,2859.46 1725.6,2723.63 ; 4590,749.66 4982.83,749.66 4982.83,849.92 4590,849.92 4590,749.66 ; 5016.39,749.66 5285.82,749.66 5285.82,849.92 5016.39,849.92 5016.39,749.66 ; 5284.95,283.76 5756.2,283.76 5756.2,422.89 5284.95,422.89 5284.95,283.76 ; 5286.19,452 5620,452 5620,629.35 5286.19,629.35 5286.19,452
  text "Canagey 1.0" at 775.52,4003.26 h200
  text "+24V" at 5239.18,3809.69 h78.74 r180
  text "M-DIR" at 3846.46,3798.33 h78.74 r180
  text "M-FG" at 4024.24,3798.33 h78.74 r180
  text "M -ve" at 4221.09,3798.33 h78.74 r180
  text "M +ve" at 4427,3798.33 h78.74 r180
  text "M-DIR" at 2430.48,3796.18 h78.74 r180
  text "M-FG" at 2608.26,3796.18 h78.74 r180
  text "M -ve" at 2805.11,3796.18 h78.74 r180
  text "M +ve" at 3011.02,3796.18 h78.74 r180
  text "SGND" at 4823.87,3797.03 h78.74 r180
  text "GND" at 5013.39,3797.03 h78.74 r180
  text "MOTOR 4" at 301.46,3792.93 h78.74
  text "MOTOR 3" at 848.7,3792.93 h78.74
  text "M-SPD" at 3629.07,3787.67 h78.74 r180
  text "M-SPD" at 2213.08,3785.53 h78.74 r180
  text "BLDC DRIVER - 3" at 4427.55,3730.64 h100 r180
  text "BLDC DRIVER - 4" at 3011.57,3728.5 h100 r180
  text "POWER IN" at 5247.63,3566.82 h100 r180
  text "MOTOR 1" at 301.46,3202.38 h78.74
  text "MOTOR 2" at 848.7,3202.38 h78.74
  text "CAN IN" at 1423.68,3202.37 h78.74
  text "UART" at 570.42,2505.43 h78.74
  text "GND" at 577.42,2454.8 h60
  text "RX" at 708.93,2454.8 h60
  text "TX" at 800.54,2454.79 h60
  text "TAG" at 1415.56,2447.37 h78.74
  text "BOOT" at -53.12,1984.85 h60 r90
  text "RESET" at -53.12,1573.89 h60 r90
  text "FUSE" at 5516.47,1566.33 h78.74
  text "24V" at 5509.8,1487.77 h60
  text "CAN" at 5417.44,1113.45 h78.74 r90
  text "RS485" at 5691.47,1113.45 h78.74 r90
  text "USB TYPE C" at -49.3,857.36 h60 r90
  text "VBUS" at 441.95,841.14 h60
  text "1" at 4649.03,697.04 h60 r90
  text "OVR-CR" at 65.69,680.85 h60
  text "SLAVE CAN IN" at 4662.62,617.85 h100
  text "VBUS" at 63.37,556.23 h60
  text "3V3" at 63.37,431.06 h60
  text "BLDC DRIVER - 2" at 3431.51,380.91 h100
  text "BLDC DRIVER - 1" at 2014.67,380.05 h100
  text "M-SPD" at 4229.99,323.89 h78.74
  text "M-SPD" at 2813.15,323.03 h78.74
  text "M +ve" at 3432.06,313.23 h78.74
  text "M -ve" at 3637.96,313.23 h78.74
  text "M-FG" at 3834.81,313.23 h78.74
  text "M-DIR" at 4012.59,313.23 h78.74
  text "M +ve" at 2015.22,312.37 h78.74
  text "M -ve" at 2221.12,312.37 h78.74
  text "M-FG" at 2417.97,312.37 h78.74
  text "M-DIR" at 2595.75,312.37 h78.74
  text "5V0" at 63.26,307.22 h60
  text "1" at 5316.48,248.77 h60 r90
  text "5V0" at 772.29,-49.29 h60
Bottom Overlay:
  text "Rev-v2.0" at -31.69,3136.1 h60 r270
  text "BLDC DRIVER" at 79.62,3039.46 h60 r270
Top Solder:
  region: 348.55,4101.83 348.55,3998.99 683.2,3998.99 683.2,4101.83
  region: -107.91,4000.3 -107.91,4222.8 -107.18,4223.53 115.32,4223.53 cw(c49.93,4065.68) 220.79,4065.68 cw(c49.93,4065.68) 49.93,3894.83 cw(c49.93,4065.68)
  region: 116.05,-107.91 -106.44,-107.91 -107.18,-107.18 -107.18,115.32 cw(c50.67,49.93) 50.67,220.79 cw(c50.67,49.93) 221.52,49.93 cw(c50.67,49.93)
  region: 5575.47,-107.55 5797.97,-107.55 5798.7,-106.81 5798.7,115.68 ccw(c5640.85,50.3) 5640.85,221.16 ccw(c5640.85,50.3) 5470,50.3 ccw(c5640.85,50.3)
  region: 5798.33,4001.04 5798.33,4223.53 5797.6,4224.27 5575.1,4224.27 ccw(c5640.49,4066.42) 5469.63,4066.42 ccw(c5640.49,4066.42) 5640.49,3895.56 ccw(c5640.49,4066.42)
Bottom Solder:
  region: 348.55,4101.57 348.55,3998.99 683.2,3998.99 683.2,4101.57
  region: 115.32,4223.53 -107.18,4223.53 -107.91,4222.8 -107.91,4000.3 ccw(c49.93,4065.68) 49.93,3894.83 ccw(c49.93,4065.68) 220.79,4065.68 ccw(c49.93,4065.68)
  region: -107.18,115.32 -107.18,-107.18 -106.44,-107.91 116.05,-107.91 ccw(c50.67,49.93) 221.52,49.93 ccw(c50.67,49.93) 50.67,220.79 ccw(c50.67,49.93)
  region: 5575.47,-107.55 5797.97,-107.55 5798.7,-106.81 5798.7,115.68 ccw(c5640.85,50.3) 5640.85,221.16 ccw(c5640.85,50.3) 5470,50.3 ccw(c5640.85,50.3)
  region: 5798.33,4001.04 5798.33,4223.53 5797.6,4224.27 5575.1,4224.27 ccw(c5640.49,4066.42) 5469.63,4066.42 ccw(c5640.49,4066.42) 5640.49,3895.56 ccw(c5640.49,4066.42)
Board Outline:
  the board outline again, w10
Fabrication:
  drawing of 295 lines, arcs and shapes, not listed
  text "Layer" at 7270.34,4130 h60
  text "Name" at 7680.26,4130 h60
  text "Material" at 8610,4130 h60
  text "Thickness" at 9469.77,4130 h60
  text "Constant" at 10119.6,4130 h60
  text "Board Layer Stack" at 10689.46,4130 h60
  text "Top Overlay" at 7680.26,4010 h60
  text "Top Solder" at 7680.26,3890 h60
  text "Solder Resist" at 8610,3890 h60
  text "0.010mm" at 9469.77,3890 h60
  text "3.5" at 10119.6,3890 h60
  text "1" at 7270.34,3770 h60
  text "Top Layer" at 7680.26,3770 h60
  text "0.035mm" at 9469.77,3770 h60
  text "Dielectric 2" at 7680.26,3650 h60
  text "PP-006" at 8610,3650 h60
  text "0.203mm" at 9469.77,3650 h60
  text "4.4" at 10119.6,3650 h60
  text "2" at 7270.34,3530 h60
  text "Layer 1" at 7680.26,3530 h60
  text "CF-004" at 8610,3530 h60
  text "0.035mm" at 9469.77,3530 h60
  text "Dielectric 1" at 7680.26,3410 h60
  text "FR-4" at 8610,3410 h60
  text "1.030mm" at 9469.77,3410 h60
  text "4.6" at 10119.6,3410 h60
  text "3" at 7270.34,3290 h60
  text "Layer 2" at 7680.26,3290 h60
  text "CF-004" at 8610,3290 h60
  text "0.035mm" at 9469.77,3290 h60
  text "Dielectric 3" at 7680.26,3170 h60
  text "PP-006" at 8610,3170 h60
  text "0.203mm" at 9469.77,3170 h60
  text "4.4" at 10119.6,3170 h60
  text "4" at 7270.34,3050 h60
  text "Bottom Layer" at 7680.26,3050 h60
  text "0.035mm" at 9469.77,3050 h60
  text "Bottom Solder" at 7680.26,2930 h60
  text "Solder Resist" at 8610,2930 h60
  text "0.010mm" at 9469.77,2930 h60
  text "3.5" at 10119.6,2930 h60
  text "Bottom Overlay" at 7680.26,2810 h60
  text "Total board thickness:" at 7270.34,2690 h60
  text "1.596mm" at 9469.77,2690 h60
Drill Drawing:
  drawing of 189 lines, arcs and shapes, not listed
  text "Symbol" at -10.26,7890 h72
  text "Count" at 495.62,7890 h72
  text "Hole Size" at 1095.46,7890 h72
  text "Plated" at 2245.13,7890 h72
  text "Hole Type" at 2751,7890 h72
  text "Drill Layer Pair" at 3484.8,7890 h72
  text "Via/Pad" at 4984.35,7890 h72
  text "Pad Shape" at 5574.2,7890 h72
  text "Template" at 6320,7890 h72
  text "Description" at 7509.65,7890 h72
  text "Hole Tolerance (+)" at 8363.41,7890 h72
  text "Hole Tolerance (-)" at 9697.02,7890 h72
  text "1" at 495.62,7740 h60
  text "20.47mil (0.520mm)" at 1095.46,7740 h60
  text "NPTH" at 2245.13,7740 h60
  text "Round" at 2751,7740 h60
  text "Top Layer - Bottom Layer" at 3484.8,7740 h60
  text "Pad" at 4984.35,7740 h60
  text "Rounded" at 5574.2,7740 h60
  text "c0hn52" at 6320,7740 h60
  text "1" at 495.62,7590 h60
  text "23.62mil (0.600mm)" at 1095.46,7590 h60
  text "NPTH" at 2245.13,7590 h60
  text "Slot" at 2751,7590 h60
  text "Top Layer - Bottom Layer" at 3484.8,7590 h60
  text "Pad" at 4984.35,7590 h60
  text "Rounded" at 5574.2,7590 h60
  text "c0hn60_72" at 6320,7590 h60
  text "1" at 495.62,7440 h60
  text "98.43mil (2.500mm)" at 1095.46,7440 h60
  text "NPTH" at 2245.13,7440 h60
  text "Round" at 2751,7440 h60
  text "Top Layer - Bottom Layer" at 3484.8,7440 h60
  text "Pad" at 4984.35,7440 h60
  text "Rounded" at 5574.2,7440 h60
  text "c0hn250p0" at 6320,7440 h60
  text "2" at 495.62,7290 h60
  text "125.98mil (3.200mm)" at 1095.46,7290 h60
  text "NPTH" at 2245.13,7290 h60
  text "Round" at 2751,7290 h60
  text "Top Layer - Bottom Layer" at 3484.8,7290 h60
  text "Pad" at 4984.35,7290 h60
  text "Rounded" at 5574.2,7290 h60
  text "c0hn320p0" at 6320,7290 h60
  text "3" at 495.62,7140 h60
  text "39.02mil (0.991mm)" at 1095.46,7140 h60
  text "NPTH" at 2245.13,7140 h60
  text "Round" at 2751,7140 h60
  text "Top Layer - Bottom Layer" at 3484.8,7140 h60
  text "Pad" at 4984.35,7140 h60
  text "Rounded" at 5574.2,7140 h60
  text "c0hn99" at 6320,7140 h60
  text "3" at 495.62,6990 h60
  text "62.99mil (1.600mm)" at 1095.46,6990 h60
  text "PTH" at 2245.13,6990 h60
  text "Round" at 2751,6990 h60
  text "Top Layer - Bottom Layer" at 3484.8,6990 h60
  text "Pad" at 4984.35,6990 h60
  text "(Mixed)" at 5574.2,6990 h60
  text "(Mixed)" at 6320,6990 h60
  text "4" at 495.62,6840 h60
  text "23.62mil (0.600mm)" at 1095.46,6840 h60
  text "PTH" at 2245.13,6840 h60
  text "Slot" at 2751,6840 h60
  text "Top Layer - Bottom Layer" at 3484.8,6840 h60
  text "Pad" at 4984.35,6840 h60
  text "Rounded" at 5574.2,6840 h60
  text "r135_110h60_85r55" at 6320,6840 h60
  text "4" at 495.62,6690 h60
  text "93.50mil (2.375mm)" at 1095.46,6690 h60
  text "NPTH" at 2245.13,6690 h60
  text "Round" at 2751,6690 h60
  text "Top Layer - Bottom Layer" at 3484.8,6690 h60
  text "Pad" at 4984.35,6690 h60
  text "Rounded" at 5574.2,6690 h60
  text "c0hn238" at 6320,6690 h60
  text "7" at 495.62,6540 h60
  text "35.43mil (0.900mm)" at 1095.46,6540 h60
  text "PTH" at 2245.13,6540 h60
  text "Round" at 2751,6540 h60
  text "Top Layer - Bottom Layer" at 3484.8,6540 h60
  text "Pad" at 4984.35,6540 h60
  text "(Mixed)" at 5574.2,6540 h60
  text "(Mixed)" at 6320,6540 h60
  text "7" at 495.62,6390 h60
  text "122.05mil (3.100mm)" at 1095.46,6390 h60
  text "PTH" at 2245.13,6390 h60
  text "Round" at 2751,6390 h60
  text "Top Layer - Bottom Layer" at 3484.8,6390 h60
  text "Pad" at 4984.35,6390 h60
  text "Rounded" at 5574.2,6390 h60
  text "(Mixed)" at 6320,6390 h60
  text "8" at 495.62,6240 h60
  text "39.37mil (1.000mm)" at 1095.46,6240 h60
  text "PTH" at 2245.13,6240 h60
  text "Round" at 2751,6240 h60
  text "Top Layer - Bottom Layer" at 3484.8,6240 h60
  text "Pad" at 4984.35,6240 h60
  text "Rounded" at 5574.2,6240 h60
  text "c152h100m163mx163p0" at 6320,6240 h60
  text "16" at 495.62,6090 h60
  text "47.24mil (1.200mm)" at 1095.46,6090 h60
  text "PTH" at 2245.13,6090 h60
  text "Round" at 2751,6090 h60
  text "Top Layer - Bottom Layer" at 3484.8,6090 h60
  text "Pad" at 4984.35,6090 h60
  text "(Mixed)" at 5574.2,6090 h60
  text "(Mixed)" at 6320,6090 h60
  text "20" at 495.62,5940 h60
  text "28.35mil (0.720mm)" at 1095.46,5940 h60
  text "PTH" at 2245.13,5940 h60
  text "Round" at 2751,5940 h60
  text "Top Layer - Bottom Layer" at 3484.8,5940 h60
  text "Pad" at 4984.35,5940 h60
  text "Rounded" at 5574.2,5940 h60
  text "c110h72m120mx120p0" at 6320,5940 h60
  text "24" at 495.62,5790 h60
  text "7.87mil (0.200mm)" at 1095.46,5790 h60
  text "PTH" at 2245.13,5790 h60
  text "Round" at 2751,5790 h60
  text "Top Layer - Bottom Layer" at 3484.8,5790 h60
  text "Via" at 4984.35,5790 h60
  text "Rounded" at 5574.2,5790 h60
  text "v40h20" at 6320,5790 h60
  text "A" at -39.35,5780.01 h66.67
  text "28" at 495.62,5640 h60
  text "59.06mil (1.500mm)" at 1095.46,5640 h60
  text "PTH" at 2245.13,5640 h60
  text "Round" at 2751,5640 h60
  text "Top Layer - Bottom Layer" at 3484.8,5640 h60
  text "Pad" at 4984.35,5640 h60
  text "(Mixed)" at 5574.2,5640 h60
  text "(Mixed)" at 6320,5640 h60
  text "495" at 495.62,5490 h60
  text "11.81mil (0.300mm)" at 1095.46,5490 h60
  text "PTH" at 2245.13,5490 h60
  text "Round" at 2751,5490 h60
  text "Top Layer - Bottom Layer" at 3484.8,5490 h60
  text "Via" at 4984.35,5490 h60
  text "Rounded" at 5574.2,5490 h60
  text "(Mixed)" at 6320,5490 h60
  text "624 Total" at 495.62,5340 h60
  text "Slot definitions :" at -10.26,5195.03 h60
  text "Routed Path Length" at 1022.43,5195.03 h60
  text "= Calculated from tool start centre position to tool end centre position." at 2125.1,5195.03 h60
  text "Hole Length" at 1022.43,5095.05 h60
  text "= Routed Path Length + Tool Size = Slot length as defined in the PCB layout" at 1715.23,5095.05 h60

## Dimensions
5798.33,4223.53 to 5798.33,-107.18 on Dimensions
-107.18,4223.53 to 5798.33,4223.53 on Dimensions